# EAGLE board Motor Relay Day 22 (EAGLE 9.7.0)

Size 251.54 x 131.51 mm. Coordinates in mm from the lower left corner, seen from the top.
Outline: 0,0 251.54,0 251.54,131.51 0,131.51 0,0
Copper layers (1*16): Top 0.035mm / dielectric 1.5mm / Bottom 0.035mm
Design rules "default": minimum track width 6mil, minimum drill 0.35mm, track to track 6mil, track to pad 6mil, pad to pad 6mil, via to via 6mil, smd to smd 6mil, copper to edge 40mil, drill to drill 6mil, minimum pad ring 10mil, minimum via ring 8mil, stop-mask expansion 4mil, vias tented up to drill 0mil, thermal gap 10mil

## Footprints (pad centres in the part's own frame; a part is rotated, then mirrored left to right if it is on the bottom)
LEDRD254W60D565H860B_G = drill 0.981 pad 1.581: 1 -1.27,0; 2 1.27,0
LEDRD254W60D565H860B_Y = drill 0.981 pad 1.581: 1 -1.27,0; 2 1.27,0
DIODE-AXIAL = drill 1: 1 -5.08,0; 2 5.08,0
LU-5-R = drill 0.8: 1 -6.35,-3.81; 5 3.81,-3.81; 6 6.35,-3.81; 7 6.35,3.81; 8 3.81,3.81; 12 -6.35,3.81
MOTOR = drill 1.118 pad 3.15 octagon: + 2.54,0; - -2.54,0
RESAD1016W63L850D250B = drill 0.83 pad 1.43: 1 -5.08,0; 2 5.08,0
HA-06-SM065 = drill 1 pad 1.676: 1 -2.54,-2.54; 2 0,2.54; 3 2.54,-2.54
SWITCH-MOMENTARY-PTH-6.5MM = drill 1.016 pad 1.88: 1 -3.251,2.261; 2 3.251,2.261; 3 -3.251,-2.261; 4 3.251,-2.261
TO92 = drill 0.813 octagon: 1 -1.27,0; 2 0,1.905; 3 1.27,0
ARDUINO-UNO-R3-SHIELD = drill 1.016 pad 1.88: 3.3V 24.13,-2.54; 5V 24.13,0; A0 24.13,12.7; A1 24.13,15.24; A2 24.13,17.78; A3 24.13,20.32; A4 24.13,22.86; A5 24.13,25.4; AREF -24.13,-13.97; D2 -24.13,20.32; D3 -24.13,17.78; D4 -24.13,15.24; D5 -24.13,12.7; D6 -24.13,10.16; D7 -24.13,7.62; D8 -24.13,3.81; D9 -24.13,1.27; D10 -24.13,-1.27; D11 -24.13,-3.81; D12 -24.13,-6.35; D13 -24.13,-8.89; GND@0 24.13,2.54; GND@1 24.13,5.08; GND@2 -24.13,-11.43; IOREF 24.13,-7.62; NC 24.13,-10.16; RES 24.13,-5.08; RX -24.13,25.4; SCL -24.13,-19.05; SDA -24.13,-16.51; TX -24.13,22.86; VIN 24.13,7.62

## Placement (x,y rotation side)
D1  GREEN  [LEDRD254W60D565H860B_G]  99.89,69.76 0 top
D2  YELLOW  [LEDRD254W60D565H860B_Y]  216.23,69.8 0 top
D3  DIODEDIODE-AXIAL  [DIODE-AXIAL]  141.8,64.68 180 top
D4  DIODEDIODE-AXIAL  [DIODE-AXIAL]  187.02,64.72 180 top
K1  RELAY-SPDT_LU-5-R  [LU-5-R]  207.46,10.16 180 top
M1  MOTOR_HDR  [MOTOR]  116.49,8.66 90 top
R2  220  [RESAD1016W63L850D250B]  93.54,67.22 0 top
R3  1k  [RESAD1016W63L850D250B]  134.18,67.22 0 top
R4  1k  [RESAD1016W63L850D250B]  179.4,67.26 0 top
R5  220  [RESAD1016W63L850D250B]  209.88,67.26 0 top
RPOT3  250k  [HA-06-SM065]  232.74,69.8 0 top
S1  SWITCH_MOMENTARY  [SWITCH-MOMENTARY-PTH-6.5MM]  108.78,55.79 90 top
S2  SWITCH_MOMENTARY  [SWITCH-MOMENTARY-PTH-6.5MM]  121.48,55.79 90 top
T1  NPN  [TO92]  139.26,69.76 0 top
T2  NPN  [TO92]  184.48,69.8 0 top
U1  ARDUINO-UNO-R3-SHIELD  [ARDUINO-UNO-R3-SHIELD]  47.88,101.67 270 top
U4  TMP36GT9Z_TO92  [TO92]  245.44,69.8 0 top

## Library data of the parts
D1 = Tinkercad; CATEGORY: Opto-Electronic; SUB-CATEGORY: LED; VALUE: LED_GREEN
D2 = Tinkercad; CATEGORY: Opto-Electronic; SUB-CATEGORY: LED; VALUE: LED_YELLOW
D3 D4 K1 M1 R2-R5 RPOT3 S1 S2 U1 U4 = Tinkercad
T1 T2 = Tinkercad; CATEGORY: Transistor; SUB-CATEGORY: BJT; TYPE: NPN

## Nets
D1_A: D1.1 R2.2
D2_A: D2.1 R5.2
M1_+: D3.2 M1.+ T1.1
R5_1: K1.6 R5.1
T1_B: R3.2 T1.2
T2_B: R4.2 T2.2
T2_C: D4.2 K1.8 T2.1
U1_5V: D3.1 D4.1 K1.5 K1.12 M1.- RPOT3.1 U1.5V U4.3
U1_A0: RPOT3.2 U1.A0
U1_A1: U1.A1 U4.2
U1_D2: S1.1 S1.2 U1.D2
U1_D3: S2.1 S2.2 U1.D3
U1_D4: R4.1 U1.D4
U1_D5: R3.1 U1.D5
U1_D8: R2.1 U1.D8
U1_GND: D1.2 D2.2 RPOT3.3 S1.3 S1.4 S2.3 S2.4 T1.3 T2.3 U1.GND@0 U1.GND@1 U1.GND@2 U4.1

## Tracks (layer width: path | path; a pad name or v marks a point on that pad's centre or on a via)
D1_A  (1 unrouted)
D2_A  (1 unrouted)
M1_+  (2 unrouted)
R5_1  (1 unrouted)
T1_B  (1 unrouted)
T2_B  (1 unrouted)
T2_C  (2 unrouted)
U1_5V  (7 unrouted)
U1_A0  (1 unrouted)
U1_A1  (1 unrouted)
U1_D2  (2 unrouted)
U1_D3  (2 unrouted)
U1_D4  (1 unrouted)
U1_D5  (1 unrouted)
U1_D8  (1 unrouted)
U1_GND  (12 unrouted)